# Altium PCB STM32F407VET6-Mini开发板封装.pcbdoc
Units mil, origin at the board's own origin, x right, y up, seen from the top; angles counter-clockwise.
Board outline 2110 x 3200.42 mil, 2 copper layers (Top Layer, Bottom Layer), stack 62.206 mil thick; 1 components, 0 nets, 92 pads, 0 vias.
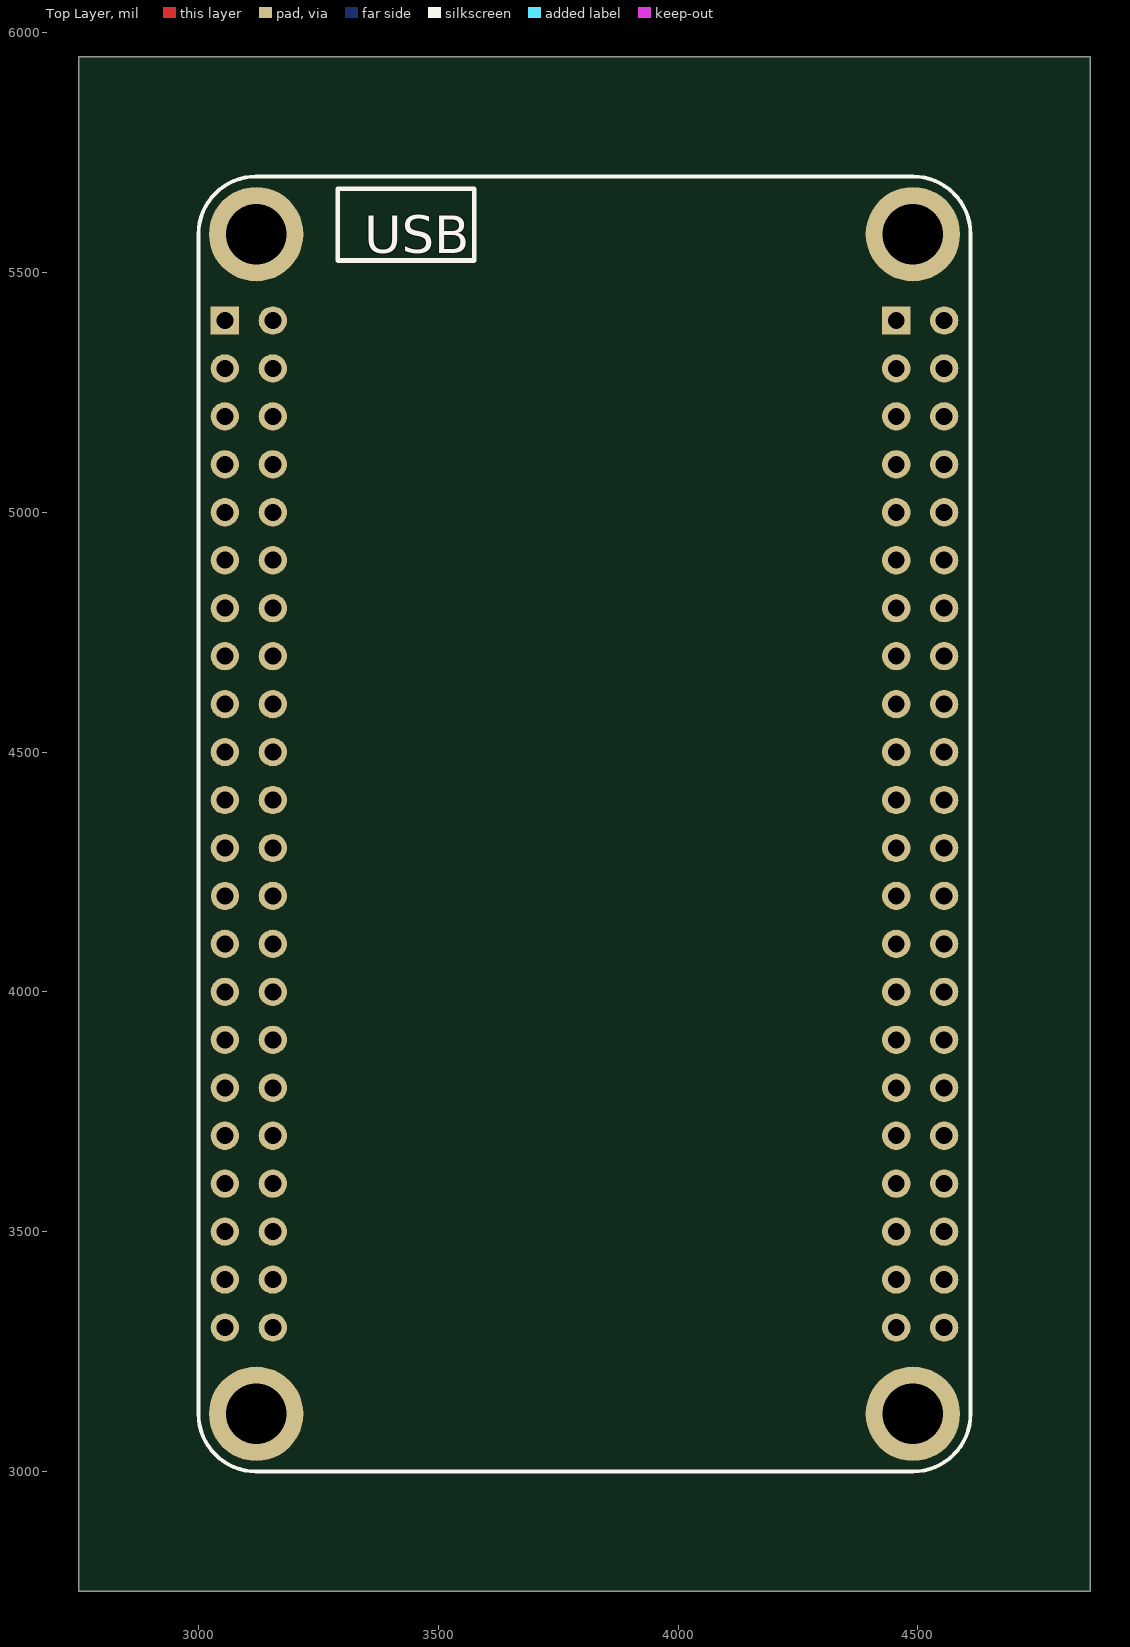
[diagram p0: Top Layer view]
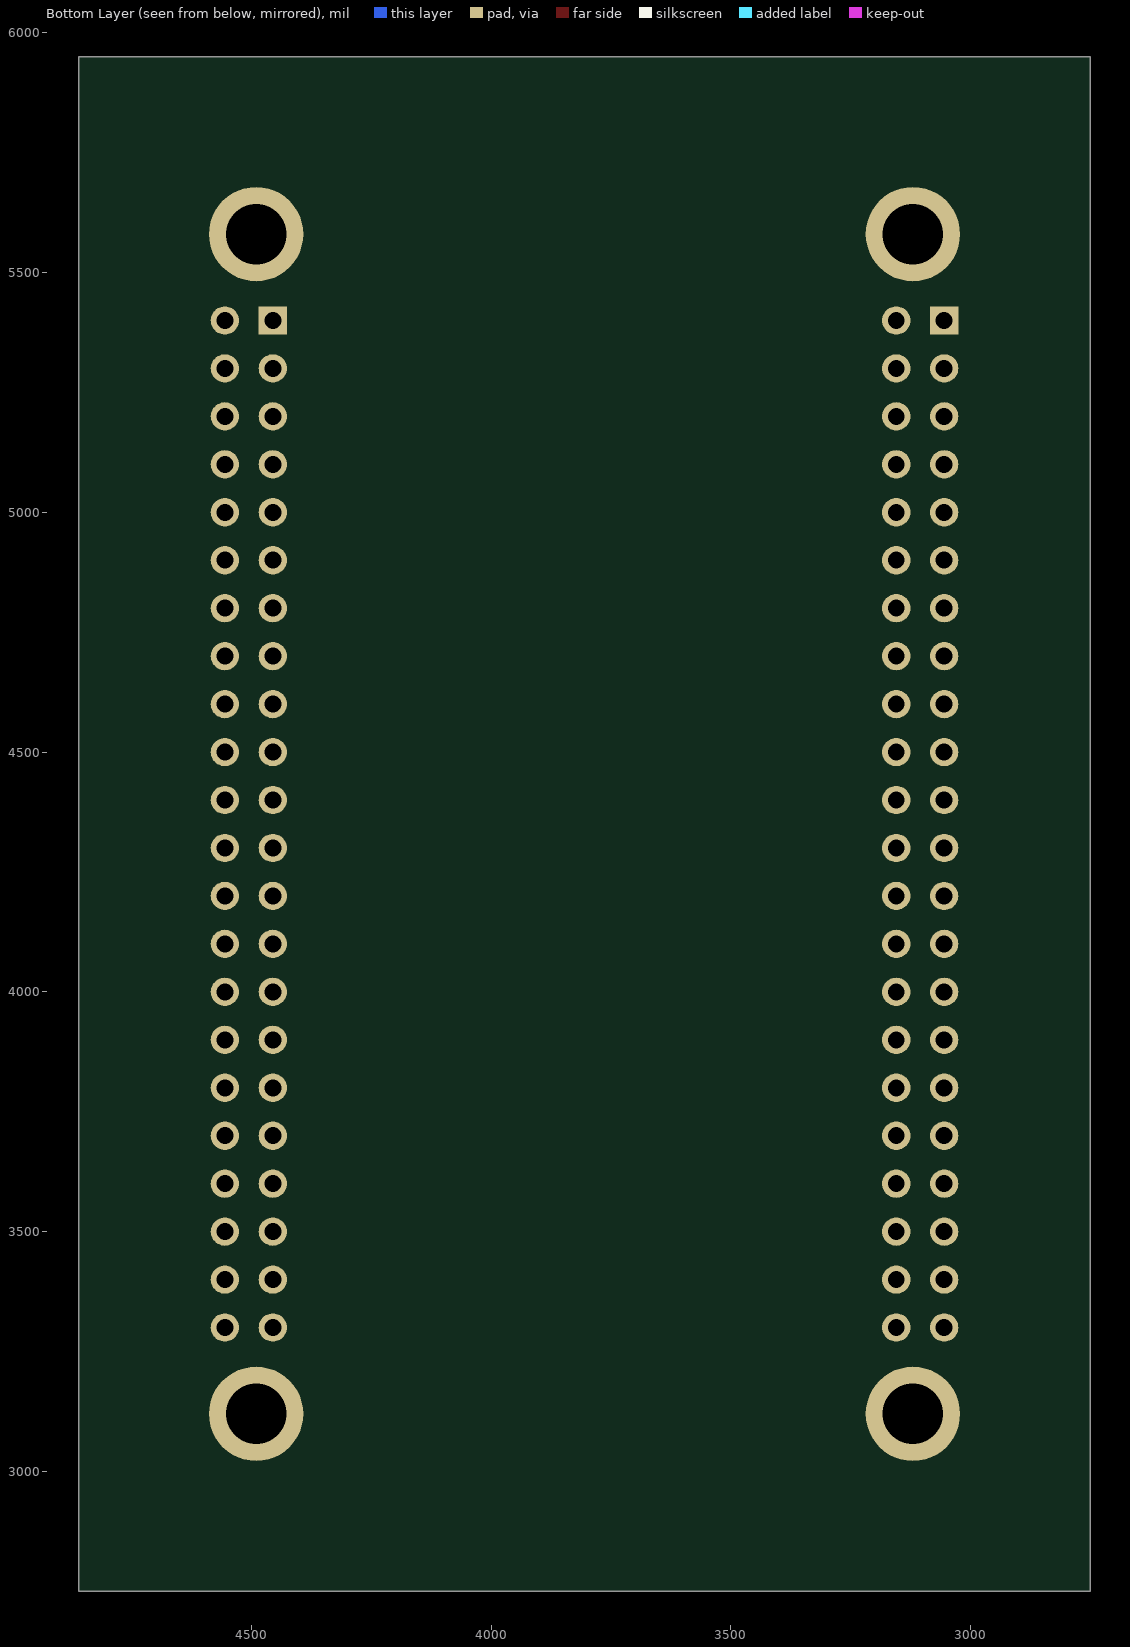
[diagram p1: Bottom Layer view, seen from below]

## Layer stack, top to bottom
Top Solder Mask Layer: solder mask 0.394, Dk 3.3
Top Layer: signal copper 1.379
Dielectric1: surface 59.449, FR4, Dk 4.5
Bottom Layer: signal copper 1.378
Bottom Solder Mask Layer: solder mask 0.394, Dk 3.3

## Board outline
4860,2750 2750,2750 2750,5950.42 4860,5950.42

## Components (designator, comment, footprint, x,y, rotation, side; value= is the part's Value field where it differs from the comment)
? "" STM32F407VET6-Mini开发板封装 3930.21,4185 r0 top

## Footprints (in the part's own frame and the unit in brackets; to place one, negate y for a bottom-side part, rotate by r counter-clockwise, add the part's x,y. Pads: shape width x height; smd on the part's side, far side on the other; paste and mask are expansions set on the pad)
STM32F407VET6-Mini开发板封装 [mm]
  rect 1.5x1.5 hole 0.9: 1(-22.23,30.866) 45(13.33,30.866)
  round 1.5 hole 0.9: 2(-22.23,28.326) 3(-22.23,25.786) 4(-22.23,23.246) 5(-22.23,20.706) 6(-22.23,18.166) 7(-22.23,15.626) 8(-22.23,13.086) 9(-22.23,10.546) 10(-22.23,8.006) 11(-22.23,5.466) 12(-22.23,2.926) 13(-22.225,0.381) 14(-22.23,-2.154) 15(-22.23,-4.694) 16(-22.23,-7.234) 17(-22.23,-9.774) 18(-22.23,-12.314) 19(-22.23,-14.854) 20(-22.23,-17.394) 21(-22.23,-19.934) 22(-22.23,-22.474) 23(-19.69,-22.474) 24(-19.69,-19.934) 25(-19.69,-17.394) 26(-19.69,-14.854) 27(-19.69,-12.314) 28(-19.69,-9.774) 29(-19.69,-7.234) 30(-19.69,-4.694) 31(-19.69,-2.154) 32(-19.69,0.386) 33(-19.69,2.926) 34(-19.69,5.466) 35(-19.69,8.006) 36(-19.69,10.546) 37(-19.69,13.086) 38(-19.69,15.626) 39(-19.69,18.166) 40(-19.69,20.706) 41(-19.69,23.246) 42(-19.69,25.786) 43(-19.69,28.326) 44(-19.69,30.866) 46(13.33,28.326) 47(13.33,25.786) 48(13.33,23.246) 49(13.33,20.706) 50(13.33,18.166) 51(13.33,15.626) 52(13.33,13.086) 53(13.33,10.546) 54(13.33,8.006) 55(13.33,5.466) 56(13.33,2.926) 57(13.33,0.386) 58(13.33,-2.154) 59(13.33,-4.694) 60(13.33,-7.234) 61(13.33,-9.774) 62(13.33,-12.314) 63(13.33,-14.854) 64(13.33,-17.394) 65(13.33,-19.934) 66(13.33,-22.474) 67(15.87,-22.474) 68(15.87,-19.934) 69(15.87,-17.394) 70(15.87,-14.854) 71(15.87,-12.314) 72(15.87,-9.774) 73(15.87,-7.234) 74(15.87,-4.694) 75(15.87,-2.154) 76(15.87,0.386) 77(15.87,2.926) 78(15.87,5.466) 79(15.87,8.006) 80(15.87,10.546) 81(15.87,13.086) 82(15.87,15.626) 83(15.87,18.166) 84(15.87,20.706) 85(15.87,23.246) 86(15.87,25.786) 87(15.87,28.326) 88(15.87,30.866)
  round 5 hole 3.2: ""(-20.574,-27.046) ""(-20.574,35.438) ""(14.213,-27.046) ""(14.213,35.438)
  silkscreen extent -23.63,-30.1 17.27,38.49

## Nets (pads, with @x,y where several pads share a name; then routed paths per layer and width w, separated by ;. In a path a pad name is that pad's centre, name@x,y a point inside that pad or via, vN(x,y) a via of type N, cw(c..) or ccw(c..) an arc to the next point about the centre after c; other vN are vias at no path point)
pads on no net: ?. ?.1 ?.2 ?.3 ?.4 ?.5 ?.6 ?.7 ?.8 ?.9 ?.10 ?.11 ?.12 ?.13 ?.14 ?.15 ?.16 ?.17 ?.18 ?.19 ?.20 ?.21 ?.22 ?.23 ?.24 ?.25 ?.26 ?.27 ?.28 ?.29 ?.30 ?.31 ?.32 ?.33 ?.34 ?.35 ?.36 ?.37 ?.38 ?.39 ?.40 ?.41 ?.42 ?.43 ?.44 ?.45 ?.46 ?.47 ?.48 ?.49 ?.50 ?.51 ?.52 ?.53 ?.54 ?.55 ?.56 ?.57 ?.58 ?.59 ?.60 ?.61 ?.62 ?.63 ?.64 ?.65 ?.66 ?.67 ?.68 ?.69 ?.70 ?.71 ?.72 ?.73 ?.74 ?.75 ?.76 ?.77 ?.78 ?.79 ?.80 ?.81 ?.82 ?.83 ?.84 ?.85 ?.86 ?.87 ?.88

## Text inside footprints (layer, text, board x,y; h text height)
?: Top Silkscreen Layer "USB" at 3345.21,5540 h78.74